# Altium PCB PCB1.PcbDoc
Units mm, origin at the board's own origin, x right, y up, seen from the top; angles counter-clockwise.
Board outline 64.6 x 83.5 mm, 2 copper layers (Top Layer, Bottom Layer); 84 components, 48 nets, 237 pads, 0 vias.
Unrouted connection lines stored in the file: 143.
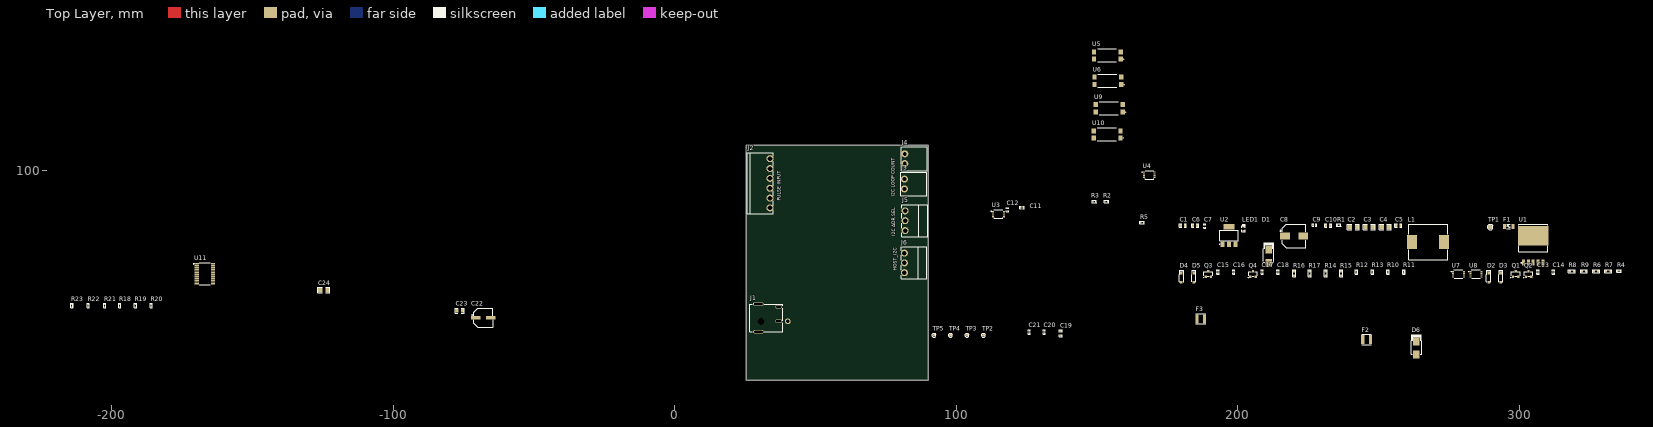
[diagram p0: Top Layer view]
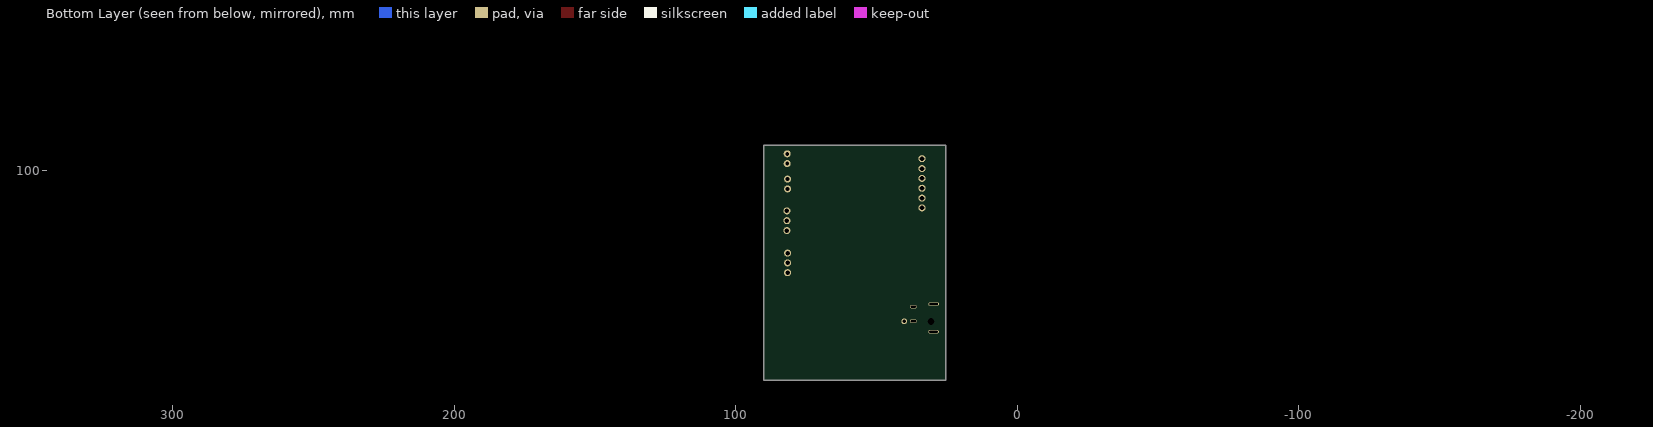
[diagram p1: Bottom Layer view, seen from below]

## Layer stack, top to bottom
Top Solder: solder mask 0.0102, Solder Resist, Dk 3.5
Top Layer: signal copper 0.0356
Dielectric 1: dielectric 0.32, FR-4, Dk 4.8
Bottom Layer: signal copper 0.0356
Bottom Solder: solder mask 0.0102, Solder Resist, Dk 3.5

## Board outline
25.4,25.4 25.4,108.9 90,108.9 90,25.4

## Design rules (kind name [scope] priority, off if disabled: settings)
Clearance [All] p1: gap=0.254 ignorepadtopadclearanceinfootprint=FALSE except(0: Arc-Hole Track-Hole SMDPad-Hole THPad-Hole Via-Hole Fill-Hole Poly-Hole Region-Hole Text-Hole)
PolygonConnect [All] p1: connectstyle=Relief reliefconductorwidth=0.254 reliefentries=4 polygonreliefangle="90 Angle" airgapwidth=0.254
RoutingVias [All] p1: holewidth=0.711 width=1.27 viastyle="Through Hole" minholewidth=0.711 minwidth=1.27 maxholewidth=0.711 maxwidth=1.27
SolderMaskExpansion [All] p1: expansion=0.102 istentingtop=FALSE
Width [All] p1: maxlimit=0.254 minlimit=0.254 preferedwidth=0.254
30 further rules are at their usual default settings.

## Classes and differential pairs
component class "Pulse counter_Sheet": C11 C12 C13 C14 C15 C16 C17 C18 D2 D3 D4 D5 Q1 Q2 Q3 Q4 R2 R3 R4 R5 R6 R7 R8 R9 R10 R11 R12 R13 R14 R15 R16 R17 TP2 TP3 TP4 TP5 U3 U4 U5 U6 U7 U8 U9 U10
component class Power_Sheet: C1 C2 C3 C4 C5 C6 C7 C8 C9 C10 D1 F1 L1 LED1 R1 TP1 U1 U2
component class "I2C Mux_Sheet": C19 C20 C21 R18 R19 R20 R21 R22 R23 U11
component class Connector_Sheet: C22 C23 C24 D6 F2 F3 J1 J2 J3 J4 J5 J6

## Components (designator, comment, footprint, x,y, rotation, side; value= is the part's Value field where it differs from the comment)
C1 "10uF" Cap-0603 180.467,80.391 r0 top
C2 "47uF" Cap-1206 241.046,79.883 r0 top
C3 "47uF" Cap-1206 246.634,79.883 r0 top
C4 "47uF" Cap-1206 252.349,79.883 r0 top
C5 "0.1uF" Cap-0603 257.048,80.391 r0 top value=100nF
C6 "10uF" Cap-0603 184.785,80.391 r0 top
C7 "100nF" cap-0402 188.214,80.137 r90 top
C8 "100uF" UUD-100uF-8mmDia 219.964,76.708 r0 top
C9 "100nF" cap-0402 227.203,80.518 r0 top
C10 "0.47uF" Cap-0603 232.029,80.391 r0 top
C11 "1uF" Cap-0402 123.317,86.741 r180 top
C12 "100nF" cap-0402 118.11,85.979 r270 top
C13 "1uF" Cap-0402 306.578,63.881 r90 top
C14 "100nF" cap-0402 312.166,63.881 r90 top
C15 "1uF" Cap-0402 192.913,63.881 r90 top
C16 "100nF" cap-0402 198.501,63.881 r90 top
C17 "1uF" Cap-0402 208.661,63.881 r90 top
C18 "100nF" cap-0402 214.249,63.881 r90 top
C19 "10uF" Cap-0603 137.16,42.037 r90 top
C20 "100nF" cap-0402 131.191,42.545 r90 top
C21 "1uF" Cap-0402 125.857,42.545 r90 top
C22 "220uF" 189RV0019 -68.072,47.625 r0 top
C23 "1uF" Cap-0805 -76.454,50.165 r0 top
C24 "47uF" Cap-1206 -124.714,57.404 r0 top
D1 "SS54B-HF" SMB_ 210.947,69.469 r90 top
D2 "AZ4024-01G" SOD-123 289.052,61.849 r90 top
D3 "AZ4024-01G" SOD-123 293.37,61.849 r90 top
D4 "AZ4024-01G" SOD-123 179.959,61.849 r90 top
D5 "AZ4024-01G" SOD-123 184.277,61.849 r90 top
D6 "SS510B" SMB_ 263.398,36.83 r90 top
F1 "1206L300SLTHYR" "Fuse 1206 (3216 Metric)" 296.164,80.01 r0 top
F2 "1210L075/24PR" FUSE-1210 245.745,39.878 r0 top
F3 "1210L075/24PR" FUSE-1210 186.817,47.244 r0 top
J1 "DC-044K-D025" DC-044K-D025 34.882,47.56 r0 top
J2 "JL15EDGRC-35006G01" JL15EDGRC-35006G01 33.782,95.377 r270 top
J3 "691322110002" 691322110002 81.534,95.123 r90 top
J4 "691322110002" 691322110002 81.661,104.112 r90 top
J5 "DB2ERC-3.5-3P-GN" DB2ERC-3.5-3P-GN 81.788,82.098 r90 top
J6 "DB2ERC-3.5-3P-GN" DB2ERC-3.5-3P-GN 81.534,67.112 r90 top
L1 "68uH" FCH1365-680M 267.589,74.549 r0 top
LED1 "RED" LED-0603 202.057,79.248 r90 top
Q1 "BC846B(1B)" SOT-23 298.704,63.119 r0 top
Q2 "BC846B(1B)" SOT-23 303.276,63.119 r0 top
Q3 "BC846B(1B)" SOT-23 189.484,63.119 r0 top
Q4 "BC846B(1B)" SOT-23 205.359,63.119 r0 top
R1 "499R" Res-0402 235.839,80.518 r0 top
R2 "1K" Res-0402 153.289,88.9 r0 top
R3 "1K" Res-0402 148.971,88.9 r0 top
R4 "1K" Res-0402 335.407,64.262 r0 top
R5 "1K" Res-0402 165.989,81.407 r0 top
R6 "1K" Res-0603 327.279,64.135 r0 top value=1kR
R7 "1K" Res-0603 331.597,64.135 r0 top value=1kR
R8 "3.3kΩ" Res-0603 318.643,64.135 r0 top
R9 "3.3kΩ" Res-0603 322.961,64.135 r0 top
R10 "1K" Res-0402 253.365,63.881 r90 top
R11 "1K" Res-0402 258.953,63.881 r90 top
R12 "1K" Res-0402 242.189,63.881 r90 top
R13 "1K" Res-0402 247.777,63.881 r90 top
R14 "1K" Res-0603 231.14,63.373 r90 top value=1kR
R15 "1K" Res-0603 236.728,63.373 r90 top value=1kR
R16 "3.3kΩ" Res-0603 219.964,63.373 r90 top
R17 "3.3kΩ" Res-0603 225.552,63.373 r90 top
R18 "4.7K" Res-0402 -197.231,51.943 r90 top
R19 "DNP" Res-0402 -191.643,51.943 r90 top
R20 "DNP" Res-0402 -186.055,51.943 r90 top
R21 "4.7K" Res-0402 -202.565,51.943 r90 top
R22 "4.7K" Res-0402 -208.407,51.943 r90 top
R23 "4.7K" Res-0402 -214.249,51.943 r90 top
TP1 "TEST POINT" Test-point 289.687,79.883 r0 top
TP2 "TEST POINT 0.5mm Dia" "Test-point - 0.5mm" 109.601,41.402 r90 top
TP3 "TEST POINT 0.5mm Dia" "Test-point - 0.5mm" 103.759,41.402 r90 top
TP4 "TEST POINT 0.5mm Dia" "Test-point - 0.5mm" 97.917,41.402 r90 top
TP5 "TEST POINT 0.5mm Dia" "Test-point - 0.5mm" 92.075,41.402 r90 top
U1 "LM2596SX-5.0/NOPB" DDPAK 304.927,72.009 r0 top
U2 "AMS1117-3.3" "SOT- 223" 196.85,76.835 r0 top
U3 "" 8-TMSOP 114.935,84.455 r0 top
U4 "" 8-TMSOP 168.534,98.369 r0 top
U5 "" SFH617A-2X009T 153.67,140.843 r180 top
U6 "" SFH617A-2X009T 153.797,131.826 r180 top
U7 "" 8-TMSOP 278.384,63.119 r0 top
U8 "" 8-TMSOP 284.607,63.119 r0 top
U9 "" SFH617A-2X009T 154.305,122.047 r180 top
U10 "" SFH617A-2X009T 153.543,112.776 r180 top
U11 "MAX7357EUG+" 24-TSSOP -167.005,63.246 r0 top

## Footprints (in the part's own frame and the unit in brackets; to place one, negate y for a bottom-side part, rotate by r counter-clockwise, add the part's x,y. Pads: shape width x height; smd on the part's side, far side on the other; paste and mask are expansions set on the pad)
8-TMSOP [mm]
  rect 0.73x0.4 smd: 1(-1.9,0.975) 2(-1.9,0.325) 3(-1.9,-0.325) 4(-1.9,-0.975)
  rect 0.7x0.4 smd: 5(1.9,-0.975) 6(1.9,-0.325) 7(1.9,0.325) 8(1.9,0.975)
  silkscreen extent -2.56,-1.5 1.5,1.5, body extent -2,-1.45 2,1.45, height 0.93
24-TSSOP [mm]
  rect 1.5x0.45 smd: 1(-2.9,3.575) 2(-2.9,2.925) 3(-2.9,2.275) 4(-2.9,1.625) 5(-2.9,0.975) 6(-2.9,0.325) 7(-2.9,-0.325) 8(-2.9,-0.975) 9(-2.9,-1.625) 10(-2.9,-2.275) 11(-2.9,-2.925) 12(-2.9,-3.575) 13(2.9,-3.575) 14(2.9,-2.925) 15(2.9,-2.275) 16(2.9,-1.625) 17(2.9,-0.975) 18(2.9,-0.325) 19(2.9,0.325) 20(2.9,0.975) 21(2.9,1.625) 22(2.9,2.275) 23(2.9,2.925) 24(2.9,3.575)
  silkscreen extent -3.94,-3.96 1.96,3.96, body extent -3.2,-3.9 3.2,3.9, height 1.2
189RV0019 [mm]
  rect 3.5x1.2 smd paste+0 mask+0.051: 1(-2.67,0) 2(2.67,0)
  silkscreen extent -4.07,-3.38 3.38,3.38, body extent -3.9,-3.3 3.9,3.3, height 7.75
691322110002 [mm]
  round 2.5 hole 1.4 paste+0 mask+0.051: 1(-1.75,0) 2(1.75,0)
  silkscreen extent -4.2,-8 4.2,1.27, body extent -4.2,-7.98 4.2,1.22, height 7.2
cap-0402 [mil]
  rect 18x25 smd mask+2.36: 1(-18.5,0) 2(18.5,0)
  silkscreen extent -31,-16 31,16, body extent -20,-10 20,10, height 19
Cap-0402 [mil]
  rect 18x25 smd mask+2.36: 1(-18.5,0) 2(18.5,0)
  silkscreen extent -31,-16 31,16, body extent -20,-10 20,10, height 19
Cap-0603 [mil]
  rect 30x35 smd mask+2.36: 1(-30,0) 2(30,0)
  silkscreen extent -49,-21 49,21, body extent -32,-16 31,16, height 34
Cap-0805 [mil] "SMD 0805"
  rect 40x60 smd mask+2.76: 1(-40,0) 2(40,0)
  silkscreen extent -64,-34 64,34, body extent -39,-25 39,25, height 30
Cap-1206 [mil] "SMD 1206"
  rect 60x70 smd: 1(-50,0) 2(50,0)
  silkscreen extent -84,-39 84,39, body extent -63,-31 63,32, height 39
DB2ERC-3.5-3P-GN [mm]
  round 2.5 hole 1.6 paste+0 mask+0.051: 1(-3.5,0) 2(0,0) 3(3.5,0)
  silkscreen extent -5.7,-8 5.7,1.2, body extent -5.65,-7.93 5.65,1.27, height 7.2
DC-044K-D025 [mm]
  oval 3.8x1.2 hole 0.6 slot 3 at 0 deg copper offset 0,0 paste-2539.97 mask+0.051: 1(-5.225,4.925)
  oval 2.5x1.2 hole 0.6 slot 2 at 0 deg copper offset 0,0.001 paste-2539.97 mask+0.051: 2(1.975,3.996)
  oval 2.5x1.2 hole 0.6 slot 2 at 0 deg copper offset 0,-0.001 paste-2539.97 mask+0.051: 3(1.975,-1.206)
  round 2 hole 1.3 paste-2539.97 mask+0.051: 4(5.225,-1.205)
  oval 3.8x1.2 hole 0.6 slot 3 at 0 deg paste-2539.97 mask+0.051: 6(-5.225,-4.925)
  round 0 hole 2.5 unplated paste-2539.97 mask+0.051: MH(-4.275,-1.205)
  silkscreen extent -8.27,-4.93 3.35,4.85, body extent -8.3,-5.03 5.7,5.07, height 7.3
DDPAK [mm]
  rect 1.07x2.16 smd mask+0.05: 1(-3.4,-4.797) 2(-1.7,-4.797) 3(0,-4.797) 4(1.7,-4.797) 5(3.4,-4.797)
  rect 10.8x6.99 smd mask+0.05: 6(0,4.798)
  silkscreen extent -5.13,-4.98 5.13,8.89, body extent -5.08,-5.52 5.08,8.83, height 4.75
FCH1365-680M [mm]
  rect 3.5x5 smd paste+0 mask+0.051: 1(-5.7,0) 2(5.7,0)
  silkscreen extent -6.9,-6.3 6.9,6.3, body extent -7.2,-6.4 7.2,6.4, height 6.51
"Fuse 1206 (3216 Metric)" [mm] "0.126\" L x 0.062\" W x 0.026\" H (3.20mm x 1.58mm x 0.65mm)"
  rect 1.06x1.82 smd: 1(-1.528,0) 2(1.528,0)
  silkscreen extent -0.68,-0.85 0.68,0.85, body extent -1.6,-0.79 1.6,0.79, height 0.85
FUSE-1210 [mm]
  rect 1.15x3.2 smd: 1(-1.34,0) 2(1.34,0)
  silkscreen extent -1.72,-1.8 1.72,1.8, body extent -1.61,-1.29 1.61,1.29, height 1.8
JL15EDGRC-35006G01 [mm]
  round 2.5 hole 1.6 paste+0 mask+0.051: 1(-8.75,0) 2(-5.25,0) 3(-1.75,0) 4(1.75,0) 5(5.25,0) 6(8.75,0)
  silkscreen extent -10.9,-8.1 10.9,1.2, body extent -10.9,-8.09 10.9,1.21, height 7.3
LED-0603 [mm]
  rect 0.5x1 smd: 1(-0.75,0) 2(0.75,0)
  silkscreen extent -1.12,-0.66 1.75,0.66, body extent -0.82,-0.37 0.82,0.36, height 0.68
Res-0402 [mil]
  rect 18x25 smd mask+2.17: 1(-18.5,0) 2(18.5,0)
  silkscreen extent -32,-17 32,16, body extent -23,-11 23,11, height 16
Res-0603 [mil]
  rect 30x35 smd: 1(-30,0) 2(30,0)
  silkscreen extent -48,-21 48,21, body extent -31,-17 31,17, height 18
SFH617A-2X009T [mm]
  rect 1.52x1.78 smd mask+0.07: 1(-4.765,1.27) 2(-4.765,-1.27) 3(4.765,-1.27) 4(4.765,1.27)
  silkscreen extent -5.81,-2.36 3.53,2.36, body extent -5.08,-2.29 5.08,2.29, height 3.75
SMB_ [mm]
  rect 2.8x2.4 smd: 1(-2.3,0) 2(2.3,0)
  silkscreen extent -2.21,-1.91 4.83,1.91, body extent -2.7,-1.8 2.7,1.8, height 2.3
SOD-123 [mm]
  rect 0.95x0.9 smd: 1(-1.575,0) 2(1.575,0)
  silkscreen extent -1.37,-0.8 2.82,0.8, body extent -1.82,-0.78 1.83,0.78, height 1.5
SOT-23 [mm] "TRANS NPN 40V 0.6A SOT23"
  rect 0.82x0.92 smd: 1(-0.95,-1) 2(0.95,-1) 3(0,1)
  silkscreen extent -1.68,-1.3 1.55,0.81, body extent -1.5,-1.25 1.5,1.25, height 1.05
"SOT- 223" [mm]
  rect 1.5x2 smd: 1(-2.3,-3.05) 2(0,-3.05) 3(2.3,-3.05)
  rect 3.8x2 smd: 4(0,3.05)
  silkscreen extent -3.35,-3.2 3.3,1.8, body extent -3.25,-3.5 3.25,3.5, height 1.61
Test-point [mil]
  oct 60x60 smd: 1(0,0)
  silkscreen extent -37,-37 37,37
"Test-point - 0.5mm" [mm]
  oct 1x1 smd: 1(0,0)
  silkscreen extent -0.68,-0.68 0.68,0.68
UUD-100uF-8mmDia [mm] "0.327\" L x 0.327\" W (8.30mm x 8.30mm)"
  rect 3.5x2.5 smd: 1(-3.25,0) 2(3.25,0)
  silkscreen extent -5.05,-4.19 4.17,4.19, body extent -4.44,-4.15 4.45,4.15, height 10.06

## Part data
C1 C6 C19: library part C1608X5R1E106M080AC, "CAP CER 10UF 25V X5R 0603", Case Code (Imperial)=0603, Case Code (Metric)=1608, Dielectric=X5R, Dielectric Material=Ceramic, LCSC Part Number=C2168289, Manufacturer=TDK, Max Operating Temperature=85°C, Min Operating Temperature=-55°C, Package Quantity=1, Supplier Part Number 1=445-9015-1-ND, Tolerance=20%, Voltage Rating=25V, Capacitance=10uF, Case/Package=0603, Composition=Ceramic, Depth=0.8mm, Height=0.8mm, Item Type=Capacitor, Lead Free="Lead Free", Length=1.6mm, Manufacturer Part Number=C1608X5R1E106M080AC, Mount="Surface Mount", Packaging="Tape and Reel", Pricing 1="1=0.96, 10=0.704, 100=0.483, 500=0.38238, 1000=0.322 (USD)", REACH SVHC="No SVHC", Stock 1=61681, Supplier 1=Digi-Key, Termination=SMD/SMT, Thickness=0.039inch, Voltage Rating (DC)=25V, Weight=7.1E-05oz, Width=0.8mm
C2 C3 C4 C24: library part GRM31CR61E476ME44L, "CAP CER 47UF 25V X5R 1206", Dielectric=X5R, LCSC Part Number=C403725, Manufacturer=Murata, Supplier Part Number 1=490-16268-2-ND, Tolerance=20%, Voltage Rating (DC)=25V, Capacitance=47uF, Category="Ceramic Capacitors", ComponentLink1Description=https://search.murata.co.jp/Ceramy/image/img/A01X/partnumbering_e_01.pdf?src-supplier=Digi-Key, ComponentLink1URL=https://search.murata.co.jp/Ceramy/image/img/A01X/partnumbering_e_01.pdf?src-supplier=Digi-Key, Item Type=Capacitor, Length=3.2mm, Manufacturer Part Number=GRM31CR61E476ME44L, RoHS=Yes, Supplier 1=Digi-Key, Thickness=1.6mm, Width=1.6mm
C5: library part CL10B104KB8WPNC, "CAP CER 0.1UF 50V X7R 0603", Case Code (Imperial)=0603, Case Code (Metric)=1608, LCSC Part Number=C307348, Max Operating Temperature=125°C, Min Operating Temperature=-55°C, Ratings=AEC-Q200, Supplier Part Number=2575919, Tolerance=10%, Voltage Rating=50V, Case/Package=0603, Category="Ceramic Capacitors", ComponentLink1Description=LCSC, ComponentLink2Description=http://www.farnell.com/datasheets/2710560.pdf?src-supplier=Farnell, ComponentLink2URL=http://www.farnell.com/datasheets/2710560.pdf?src-supplier=Farnell, ComponentLink3Description=http://www.samsungsem.com/kr/support/product-search/mlcc/CL10B104KB8WPNC.jsp?src-supplier=Digi-Key, ComponentLink3URL=http://www.samsungsem.com/kr/support/product-search/mlcc/CL10B104KB8WPNC.jsp?src-supplier=Digi-Key, ComponentLink4Description=http://www.farnell.com/datasheets/2710560.pdf?src-supplier=Element14, ComponentLink4URL=http://www.farnell.com/datasheets/2710560.pdf?src-supplier=Element14, ComponentLink5Description=https://datasheet.octopart.com/CL10B104KB8WPNC-Samsung-Electro-Mechanics-datasheet-120093645.pdf?src-supplier=Future+Electronics, ComponentLink5URL=https://datasheet.octopart.com/CL10B104KB8WPNC-Samsung-Electro-Mechanics-datasheet-120093645.pdf?src-supplier=Future+Electronics, ComponentLink6Description=http://www.farnell.com/datasheets/2710560.pdf?src-supplier=Newark, ComponentLink6URL=http://www.farnell.com/datasheets/2710560.pdf?src-supplier=Newark, ComponentLink7Description=http://www.samsungsem.com/servlet/FileDownload?type=spec&file=CL10B104KB8WPNC.pdf&src-supplier=Avnet, ComponentLink7URL=http://www.samsungsem.com/servlet/FileDownload?type=spec&file=CL10B104KB8WPNC.pdf&src-supplier=Avnet, ComponentLink8Description=https://datasheet.octopart.com/CL10B104KB8WPNC-Samsung-datasheet-8326407.pdf?src-supplier=TME, ComponentLink8URL=https://datasheet.octopart.com/CL10B104KB8WPNC-Samsung-datasheet-8326407.pdf?src-supplier=TME, Height=900um, Item Type=Capacitor, Lead Free=5697LeadFree, Material=4241ConductorMaterial, Mounting Technology="Surface Mount", Packaging="Cut Tape", Pricing="100=0.021, 500=0.019, 1000=0.015, 2000=0.01 (GBP)", RoHS=Yes, RoHS Compliant=Yes, Series=CL, Stock=400, Supplier=Rs, Voltage Rating (DC)=50V
C7 C9 C12 C14 C16 C18 C20: library part C1005X7R1H104KT000F, "CAP CER 0.1UF 50V X7R 0402", Dielectric=X7R, LCSC Part Number=C361198, Manufacturer=TDK, Tolerance=10%, Voltage=25V, Category="Ceramic Capacitors", ComponentLink1Description=LCSC, ComponentLink1URL=https://www.lcsc.com/product-detail/Multilayer-Ceramic-Capacitors-MLCC-SMD-SMT_TDK-C1005X7R1H104KT000F_C361198.html, Item Type=Capacitor, Manufacturer Part Number=C1005X7R1H104KT000F, RoHS=No, Supplier 1=Avnet, Supplier Part Number 1=C1005X7R1H104KT000F
C8: library part UUD1H101MNL1GS, "CAP ALUM 100UF 20% 50V SMD", Case/Package=Radial, Dielectric Material=Aluminium, LCSC Part Number=C116241, Leakage Current=3uA, Manufacturer=Nichicon, Max Operating Temperature=105°C, Min Operating Temperature=-55°C, Package Quantity=500, Ripple Current=300mA, Supplier Part Number 1=493-2306-6-ND, Tolerance=20%, Voltage=50V, Capacitance=100uF, Category="Aluminum Electrolytic Capacitors", ComponentLink1Description=https://datasheet.ciiva.com/6002/66055-6002224.pdf?src-supplier=Farnell, ComponentLink1URL=https://datasheet.ciiva.com/6002/66055-6002224.pdf?src-supplier=Farnell, ComponentLink2Description=https://datasheet.ciiva.com/11781/0900766b80fa39e7-11781901.pdf?src-supplier=RSComponents, ComponentLink2URL=https://datasheet.ciiva.com/11781/0900766b80fa39e7-11781901.pdf?src-supplier=RSComponents, ComponentLink3Description=https://datasheet.ciiva.com/97/e-ud-97939.pdf?src-supplier=Digi-Key, ComponentLink3URL=https://datasheet.ciiva.com/97/e-ud-97939.pdf?src-supplier=Digi-Key, ComponentLink4Description=https://datasheet.ciiva.com/97/e-ud-97940.pdf?src-supplier=Digi-Key, ComponentLink4URL=https://datasheet.ciiva.com/97/e-ud-97940.pdf?src-supplier=Digi-Key, ComponentLink5Description=https://datasheet.ciiva.com/97/e-ud-97941.pdf?src-supplier=Digi-Key, ComponentLink5URL=https://datasheet.ciiva.com/97/e-ud-97941.pdf?src-supplier=Digi-Key, ComponentLink6Description=https://datasheet.ciiva.com/28458/e-ud-28458117.pdf?src-supplier=Element14, ComponentLink6URL=https://datasheet.ciiva.com/28458/e-ud-28458117.pdf?src-supplier=Element14, ComponentLink7Description=https://datasheet.ciiva.com/28458/1910936-28458133.pdf?src-supplier=Element14, ComponentLink7URL=https://datasheet.ciiva.com/28458/1910936-28458133.pdf?src-supplier=Element14, ComponentLink8Description=https://datasheet.ciiva.com/5362/e-ud-5362134.pdf?src-supplier=Mouser, ComponentLink8URL=https://datasheet.ciiva.com/5362/e-ud-5362134.pdf?src-supplier=Mouser, ComponentLink9Description=https://datasheet.ciiva.com/7781/66055-7781450.pdf?src-supplier=Element14, ComponentLink9URL=https://datasheet.ciiva.com/7781/66055-7781450.pdf?src-supplier=Element14, ComponentLink10Description=https://datasheet.ciiva.com/17354/e-ud-17354671.pdf?src-supplier=Avnet+Europe, ComponentLink10URL=https://datasheet.ciiva.com/17354/e-ud-17354671.pdf?src-supplier=Avnet+Europe, Construction=Cylindrical, Diameter=8mm, Dissipation Factor=0.14%, Height=10mm, Height - Seated (Max)=0.394inch, Impedance=340mR, Item Type=Capacitor, Lead Diameter=1.1mm, Lead Free="Lead Free", Lead Pitch=3.1mm, Length=10mm, Life (Hours)=5000Hour, Manufacturer Part Number=UUD1H101MNL1GS, Number of Pins=2, Packaging="Tape and Reel", Pricing 1="1=0.62000, 10=0.44000, 50=0.33300, 100=0.29000 (USD)", Radiation Hardening=No, REACH SVHC="No SVHC", Ripple Current (AC)=300mA, RoHS=Yes, RoHS Compliant=Yes, Series=UD, Supplier 1=Digi-Key, Termination=SMD/SMT, Voltage Rating=50V, Voltage Rating (DC)=50V
C10: library part CL10A474KB8NNNC, "CAP CER 0.47UF 50V X5R 0603", Capacitance=470nF, Case Code (Imperial)=0603, Case Code (Metric)=1608, Dielectric=X5R, LCSC Part Number=C170149, Manufacturer=Samsung, Max Operating Temperature=85°C, Min Operating Temperature=-55°C, Package Quantity=1, Tolerance=10%, Voltage Rating=50V, Case/Package=0603, Category="Ceramic Capacitors", ComponentLink1Description=https://datasheet.ciiva.com/25798/cl10a474kb8nnnc-25798516.pdf?src-supplier=Digi-Key, ComponentLink1URL=https://datasheet.ciiva.com/25798/cl10a474kb8nnnc-25798516.pdf?src-supplier=Digi-Key, ComponentLink2Description=https://datasheet.ciiva.com/15195/getdatasheetpartid-353290-15195713.pdf?src-supplier=Verical, ComponentLink2URL=https://datasheet.ciiva.com/15195/getdatasheetpartid-353290-15195713.pdf?src-supplier=Verical, Construction=Flat, Depth=0.8mm, Height=0.8mm, Lead Free="Lead Free", Length=1.6mm, Manufacturer Part Number=CL10A474KB8NNNC, Mount="Surface Mount", Packaging="Tape and Reel", Pricing 1="200000=0.04290, 300000=0.04250, 400000=0.04210, 500000=0.04170, 1000000=0.04120, 2000000=0.04080 (USD)", Radiation Hardening=No, RoHS=Yes, RoHS Compliant=Yes, Series=CL, Stock 1=196000, Supplier 1="Arrow Electronics", Supplier Part Number 1=CL10A474KB8NNNC, Thickness=0.035inch, Voltage Rating (DC)=50V, Width=0.031inch
C11 C13 C15 C17 C21: library part C1005X5R1V105K050BC, "CAP CER 1UF 35V X5R 0402", Case Code (Imperial)=0402, Case Code (Metric)=1005, Dielectric=X5R, Dielectric Material=Ceramic, Manufacturer=TDK, Max Operating Temperature=85°C, Min Operating Temperature=-55°C, Supplier Part Number=445-9073-1-ND, Tolerance=10%, Voltage Rating=35V, Case/Package=0402, ComponentLink1Description=https://datasheet.ciiva.com/26834/getdatasheetpartid-750449-26834298.pdf?src-supplier=Verical, ComponentLink1URL=https://datasheet.ciiva.com/26834/getdatasheetpartid-750449-26834298.pdf?src-supplier=Verical, ComponentLink2Description=https://datasheet.ciiva.com/28451/1796654-28451087.pdf?src-supplier=Element14, ComponentLink2URL=https://datasheet.ciiva.com/28451/1796654-28451087.pdf?src-supplier=Element14, ComponentLink3Description=https://datasheet.ciiva.com/22719/1796654-22719533.pdf?src-supplier=Element14, ComponentLink3URL=https://datasheet.ciiva.com/22719/1796654-22719533.pdf?src-supplier=Element14, Depth=0.5mm, Item Type=Capacitors, Lead Free="Lead Free", Length=1mm, Manufacturer Part Number=C1005X5R1V105K050BC, Material=4241ConductorMaterial, Mounting Technology="Surface Mount", Packaging="Tape and Reel", Pricing="1=0.15, 10=0.087, 50=0.061, 100=0.0528, 500=0.03898, 1000=0.03468, 2500=0.03011, 5000=0.02735 (USD)", Radiation Hardening=No, Reach SVHC Compliant=No, RoHS=Yes, RoHS Compliant=Yes, Series=C, Stock=682645, Supplier=Digikey
C22: library part 189RV0019, "220uF 35V 600mA@100KHz 160mΩ@100KHz ±20% SMD,D6.3xL7.7mm Aluminum Electrolytic Capacitors - SMD ROHS", LCSC Part Number=C7471881, Manufacturer=KNSCHA, Package=SMD,D6.3xL7.7mm, ComponentLink1Description=LCSC, ComponentLink1URL=https://www.lcsc.com/product-detail/Aluminum-Electrolytic-Capacitors-SMD_KNSCHA-189RV0019_C7471881.html, Item Type=Capacitors, Manufacturer Part Number=189RV0019
C23: library part GCM21BC72A105KE36L, "CAP CER 1UF 100V X7S 0805", Case Code (Imperial)=0805, Case Code (Metric)=2012, LCSC Part Number=C2842838, Manufacturer=Murata, Max Operating Temperature=125°C, Min Operating Temperature=-55°C, Ratings=AEC-Q200, Supplier Part Number 1=490-14436-1-ND, Tolerance=10%, Voltage Rating=100V, Capacitance=1uF, Case/Package=0805, Category="Ceramic Capacitors", ComponentLink1Description=http://search.murata.co.jp/Ceramy/image/img/A01X/partnumbering_e_02.pdf?src-supplier=Digi-Key, ComponentLink1URL=http://search.murata.co.jp/Ceramy/image/img/A01X/partnumbering_e_02.pdf?src-supplier=Digi-Key, Manufacturer Part Number=GCM21BC72A105KE36L, Mount="Surface Mount", Packaging="Cut Tape", Pricing 1="1=0.48000, 10=0.34100, 50=0.25800, 100=0.22480, 500=0.16650, 1000=0.14152 (USD)", RoHS=Yes, RoHS Compliant=Yes, Stock 1=179138, Supplier 1=Digi-Key
D1: "DIODE SCHOTTKY 5A 40V SMB", LCSC Part Number=C3759253, Manufacturer=Comchip, Supplier Part Number 1=750-SS54B-HF, Manufacturer Part Number=SS54B-HF, Pricing 1="1=0.56000, 10=0.32900, 50=0.32900, 100=0.17100, 1000=0.11900, 10000=0.09000 (USD)", RoHS=No, Stock 1=2862, Supplier 1=Mouser
D2 D3 D4 D5: "26.7V 24V SOD-123 ESD and Surge Protection (TVS/ESD) ROHS", LCSC Part Number=C5571859, Manufacturer=AMAZING, Package=SOD-123, ComponentLink1Description=LCSC, ComponentLink1URL=https://www.lcsc.com/product-detail/ESD-and-Surge-Protection-TVS-ESD_AMAZING-AZ4024-01G_C5571859.html, Item Type=(TVS/ESD), Manufacturer Part Number=AZ4024-01G
D6: "SCHOTTKY DIODE SMB 100V 5A", LCSC Part Number=C3011128, Manufacturer=MDD, Package=SMB, ComponentLink1Description=LCSC, ComponentLink1URL=https://www.lcsc.com/product-detail/Schottky-Barrier-Diodes-SBD_JUXING-SS510B_C3011128.html, Item Type=Diode, Manufacturer Part Number=SS510B
F1: "PTC RESET FUSE 6V 3A 1206", Case Code (Imperial)=1206, Case Code (Metric)=3216, Hold Current=3A, LCSC Part Number=C207041, Manufacturer=Littelfuse, Max Current Rating=50A, Max Operating Temperature=85°C, Max Voltage Rating (DC)=6V, Min Operating Temperature=-40°C, Package Quantity=4000, Power Dissipation=800mW, Resistance=20mR, Trip Current=6A, Approvals=UL,TUV, Case/Package=1206, Category="PTC Resettable Fuses", ComponentLink1Description=https://datasheet.ciiva.com/7438/littelfuse-lorho-ptc-7438567.pdf?src-supplier=Digi-Key, ComponentLink1URL=https://datasheet.ciiva.com/7438/littelfuse-lorho-ptc-7438567.pdf?src-supplier=Digi-Key, ComponentLink2Description=https://datasheet.ciiva.com/7438/littelfuse-lorho-ptc-7438569.pdf?src-supplier=Digi-Key, ComponentLink2URL=https://datasheet.ciiva.com/7438/littelfuse-lorho-ptc-7438569.pdf?src-supplier=Digi-Key, ComponentLink3Description=https://datasheet.ciiva.com/7438/littelfuse-lorho-ptc-7438565.pdf?src-supplier=Digi-Key, ComponentLink3URL=https://datasheet.ciiva.com/7438/littelfuse-lorho-ptc-7438565.pdf?src-supplier=Digi-Key, Item Type=Fuse, Lead Free="Lead Free", Manufacturer Part Number=1206L300SLTHYR, Operating Supply Voltage=6V, Packaging="Tape and Reel", Pricing 1="4000=0.60290 (USD)", RoHS=Yes, RoHS Compliant=Yes, Series="POLY-FUSE®, LoRho™", Stock 1=4000, Supplier 1="Arrow Electronics", Supplier Part Number 1=1206L300SLTHYR, Termination=SMD/SMT, Time to Trip=4s, Voltage Rating (DC)=6V
F2 F3: "24V 750mA 100A 1.5A 1210 Resettable Fuses ROHS", Current Rating=100A, LCSC Part Number=C207045, Manufacturer=Littlefuse, Supplier Part Number=F4146CT-ND, Voltage Rating=24V, Category="PTC Resettable Fuses", ComponentLink1Description=https://datasheet.ciiva.com/8005/littelfuse-ptc-1210l-8005372.pdf?src-supplier=Element14, ComponentLink1URL=https://datasheet.ciiva.com/8005/littelfuse-ptc-1210l-8005372.pdf?src-supplier=Element14, ComponentLink2Description=https://datasheet.ciiva.com/326/littelfuse-ptc-1210l-326060.pdf?src-supplier=Digikey, ComponentLink2URL=https://datasheet.ciiva.com/326/littelfuse-ptc-1210l-326060.pdf?src-supplier=Digikey, ComponentLink3Description=https://datasheet.ciiva.com/326/littelfuse-ptc-1210l-326061.pdf?src-supplier=Digikey, ComponentLink3URL=https://datasheet.ciiva.com/326/littelfuse-ptc-1210l-326061.pdf?src-supplier=Digikey, ComponentLink4Description=https://datasheet.ciiva.com/326/littelfuse-ptc-1210l-326062.pdf?src-supplier=Digikey, ComponentLink4URL=https://datasheet.ciiva.com/326/littelfuse-ptc-1210l-326062.pdf?src-supplier=Digikey, Height=1.8mm, Item Type=Fuse, Lead Free=5697LeadFree, Manufacturer Part Number=1210L075/24PR, Pricing="1=0.98, 5=0.81, 10=0.747, 50=0.6196, 100=0.5716, 250=0.51376, 500=0.47378, 1000=0.43676 (USD)", RoHS=Yes, Stock=2300, Supplier=Digikey
J1: "Bend insert DC Power Receptacle -30℃~+85℃ 2.5mm 6mm 7A 24V Plugin DC Power Connectors ROHS", LCSC Part Number=C963204, Manufacturer=G-Switch, Package=Plugin, ComponentLink1Description=LCSC, ComponentLink1URL=https://www.lcsc.com/product-detail/DC-Power-Connectors_G-Switch-DC-044K-D025_C963204.html, Item Type="DC Power Connectors", Manufacturer Part Number=DC-044K-D025
J2: "300V 8A 6 Bend -40℃~+105℃ 1 3.5mm 1x6P Green Receptacle-Close Push-Pull,P=3.5mm Pluggable System Terminal Block ROHS", LCSC Part Number=C409119, Manufacturer=JILN, Package=Push-Pull,P=3.5mm, ComponentLink1Description=LCSC, ComponentLink1URL=https://www.lcsc.com/product-detail/Pluggable-System-Terminal-Block_JILN-JL15EDGRC-35006G01_C409119.html, Item Type="Terminal Block", Manufacturer Part Number=JL15EDGRC-35006G01
J3 J4: "TERM BLOCK HDR 2POS 90DEG 3.5MM", Color=Green, Current=10A, Flammability Rating="UL94 V-0", Manufacturer="Wurth Electronics", Supplier Part Number=732-2769-ND, Voltage=300V, ComponentLink1Description=https://datasheet.ciiva.com/8043/1442234-8043560.pdf?src-supplier=Element14, ComponentLink1URL=https://datasheet.ciiva.com/8043/1442234-8043560.pdf?src-supplier=Element14, ComponentLink2Description=https://datasheet.ciiva.com/795/6913221100xx-795775.pdf?src-supplier=Digikey, ComponentLink2URL=https://datasheet.ciiva.com/795/6913221100xx-795775.pdf?src-supplier=Digikey, Contact Material=Brass, Height=9.2mm, Housing Material=Nylon, Item Type="Terminal Blocks", Lead Free="Lead Free", Length=10.5mm, Manufacturer Part Number=691322110002, Mounting Technology="Through Hole", Number of Contacts=2, Number of Levels=1, Number of Positions=2, Number of Positions Per Level=2, Number of Rows=1, Pitch=3.5mm, Pricing="1=0.4, 10=0.355, 50=0.306, 100=0.2745, 500=0.2574, 1000=0.2421 (USD)", Reach SVHC Compliant=Unknown, RoHS=Yes, RoHS Compliant=Yes, Series="WR-TBL Series 3221", Stock=3605, Supplier=Digikey, Termination=Solder, Voltage Rating=300V, Width=8.1mm
J5 J6: "250V 10A 3 Bend -40℃~+105℃ 1 3.5mm 1x3P Green Board Edge/Receptacle-Close Push-Pull,P=3.5mm Pluggable System Terminal Block ROHS", LCSC Part Number=C430551, Manufacturer=DORABO, Package=Push-Pull,P=5.08mm, ComponentLink1Description=LCSC, ComponentLink1URL=https://www.lcsc.com/product-detail/Pluggable-System-span-style-background-color-ff0-Terminal-span-span-style-background-color-ff0-Block-span_DORABO-DB2ERC-3-5-3P-GN_C430551.html, Item Type="Terminal Block", Manufacturer Part Number=DB2ERC-3.5-3P-GN
L1: library part FCH1365-680M, "4.5A 68uH Molding Choke ±20% 5.5A SMD,13.7x12.8mm Power Inductors ROHS", LCSC Part Number=C20415558, Manufacturer=FANGCHENG, Package=SMD,13.7x12.8mm, ComponentLink1Description=LCSC, ComponentLink1URL=https://www.lcsc.com/product-detail/Power-Inductors_FANGCHENG-FCH1365-680M_C20415558.html, Item Type=Inductor, Manufacturer Part Number=FCH1365-680M
LED1: library part NCD0603R3, "RED LED 0603 Light Emitting Diodes", LCSC Part Number=C3151730, Manufacturer="Foshan NationStar Optoelectronics", Package=0603, ComponentLink1Description=LCSC, ComponentLink1URL=https://www.lcsc.com/product-detail/Light-Emitting-Diodes-LED_Foshan-NationStar-Optoelectronics-NCD0603R3_C3151730.html, Item Type=LED, Manufacturer Part Number=NCD0603R3
Q1 Q2 Q3 Q4: "65V 300mW 200@2mA,5V 100mA NPN SOT-23 Bipolar Transistors - BJT ROHS", LCSC Part Number=C118727, Manufacturer=ST(Semtech), Package=SOT-23, ComponentLink1Description=LCSC, ComponentLink1URL=https://www.lcsc.com/product-detail/Transistors-NPN-PNP_ST-Semtech-BC846B-1B_C118727.html, Item Type=Transistor, Manufacturer Part Number=BC846B(1B)
R1: library part RC0402FR-07499RL, "RES 499 OHM 1% 1/16W 0402", Case Code (Imperial)=0402, Case Code (Metric)=1005, LCSC Part Number=C137970, Manufacturer=Yageo, Max Operating Temperature=155°C, Max Power Dissipation=63mW, Min Operating Temperature=-55°C, Package Quantity=1, Power Rating=62.5mW, Resistance Tolerance=1%, Resistor Type="Thick Film", Supplier Part Number 1=603-RC0402FR-07499RL, Temperature Coefficient=100ppm/°C, Voltage Rating=50V, Case/Package=0402, Category="Chip SMD Resistors", ComponentLink1Description=https://datasheet.ciiva.com/2453/pyu-r-int-thick-7-2453539.pdf?src-supplier=Digi-Key, ComponentLink1URL=https://datasheet.ciiva.com/2453/pyu-r-int-thick-7-2453539.pdf?src-supplier=Digi-Key, ComponentLink2Description=https://datasheet.ciiva.com/2453/pyu-r-int-thick-7-2453540.pdf?src-supplier=Digi-Key, ComponentLink2URL=https://datasheet.ciiva.com/2453/pyu-r-int-thick-7-2453540.pdf?src-supplier=Digi-Key, ComponentLink3Description=https://datasheet.ciiva.com/2453/pyu-r-int-thick-7-2453538.pdf?src-supplier=Digi-Key, ComponentLink3URL=https://datasheet.ciiva.com/2453/pyu-r-int-thick-7-2453538.pdf?src-supplier=Digi-Key, Construction=Rectangular, Depth=0.5mm, Features="Moisture Resistant", Height=0.016inch, Lead Free="Lead Free", Length=1mm, Manufacturer Part Number=RC0402FR-07499RL, Military Standard=Not, Number of Terminations=2, Packaging="Tape and Reel", Pricing 1="1=0.10000, 10=0.01200, 50=0.01200, 100=0.00500, 1000=0.00300, 10000=0.00100 (USD)", REACH SVHC="No SVHC", Resistance=499R, RoHS=Yes, RoHS Compliant=Yes, Series=RC, Size Code=0402, Stock 1=936879, Supplier 1=Mouser, Termination=SMD/SMT, Tolerance=1%, Voltage Rating (DC)=50V, Width=0.02inch
R2 R3 R4 R5 R10 R11 R12 R13: library part RC0402JR-071KL, "RES 1K OHM 5% 1/16W 0402", Case Code (Imperial)=0402, Case Code (Metric)=1005, LCSC Part Number=C105637, Manufacturer=Yageo, Max Operating Temperature=155°C, Max Power Dissipation=63mW, Min Operating Temperature=-55°C, Package Quantity=1, Power Rating=62.5mW, Resistance=1kR, Resistance Tolerance=5%, Resistor Type="Thick Film", Supplier Part Number 1=311-1.0KJRCT-ND, Temperature Coefficient=100ppm/°C, Voltage Rating=50V, Case/Package=0402, Category="Chip SMD Resistors", ComponentLink1Description=https://datasheet.ciiva.com/7983/1018594-7983558.pdf?src-supplier=Element14, ComponentLink1URL=https://datasheet.ciiva.com/7983/1018594-7983558.pdf?src-supplier=Element14, ComponentLink2Description=https://datasheet.ciiva.com/2452/pyu-r-int-thick-7-2452756.pdf?src-supplier=Digi-Key, ComponentLink2URL=https://datasheet.ciiva.com/2452/pyu-r-int-thick-7-2452756.pdf?src-supplier=Digi-Key, ComponentLink3Description=https://datasheet.ciiva.com/2452/pyu-r-int-thick-7-2452757.pdf?src-supplier=Digi-Key, ComponentLink3URL=https://datasheet.ciiva.com/2452/pyu-r-int-thick-7-2452757.pdf?src-supplier=Digi-Key, ComponentLink4Description=https://datasheet.ciiva.com/2452/pyu-r-int-thick-7-2452755.pdf?src-supplier=Digi-Key, ComponentLink4URL=https://datasheet.ciiva.com/2452/pyu-r-int-thick-7-2452755.pdf?src-supplier=Digi-Key, ComponentLink5Description=https://datasheet.ciiva.com/7850/1018594-7850170.pdf?src-supplier=Element14, ComponentLink5URL=https://datasheet.ciiva.com/7850/1018594-7850170.pdf?src-supplier=Element14, ComponentLink6Description=https://datasheet.ciiva.com/7850/1018594-7850171.pdf?src-supplier=Element14, ComponentLink6URL=https://datasheet.ciiva.com/7850/1018594-7850171.pdf?src-supplier=Element14, ComponentLink7Description=https://datasheet.ciiva.com/17081/pyu-rc0402-51-rohs-l-6-r-17081438.pdf?src-supplier=Future+Electronics, ComponentLink7URL=https://datasheet.ciiva.com/17081/pyu-rc0402-51-rohs-l-6-r-17081438.pdf?src-supplier=Future+Electronics, Construction=Rectangular, Depth=0.5mm, Features="Moisture Resistant", Height=0.016inch, Item Type=Resistor, Lead Free="Lead Free", Length=0.039inch, Manufacturer Part Number=RC0402JR-071KL, Military Standard=Not, Number of Terminations=2, Packaging="Tape and Reel", Pricing 1="1=0.10000, 10=0.01300, 100=0.00540, 1000=0.00244, 2500=0.00212, 5000=0.00175 (USD)", REACH SVHC="No SVHC", RoHS=Yes, RoHS Compliant=Yes, Series=RC, Size Code=0402, Stock 1=452315, Supplier 1=Digi-Key, Termination=SMD/SMT, Tolerance=5%, Width=0.02inch
R6 R7 R14 R15: library part CRCW06031K00FKEA, "RES SMD 1K OHM 1% 1/10W 0603", Case Code (Imperial)=0603, Case Code (Metric)=1608, LCSC Part Number=C844920, Manufacturer="Vishay Dale", Max Operating Temperature=155°C, Max Power Dissipation=100mW, Min Operating Temperature=-55°C, Package Quantity=5000, Ratings=AEC-Q200, Resistance Tolerance=1%, Resistor Type="Thick Film", Supplier Part Number=71-CRCW0603-1.0K-E3, Temperature Coefficient=100ppm/°C, Voltage Rating=75V, Case/Package=0603, Category="Chip SMD Resistors", ComponentLink1Description=https://datasheet.ciiva.com/11808/0900766b80d98afc-11808625.pdf?src-supplier=Rs, ComponentLink1URL=https://datasheet.ciiva.com/11808/0900766b80d98afc-11808625.pdf?src-supplier=Rs, ComponentLink2Description=https://datasheet.ciiva.com/11808/0900766b80d98afc-11808625.pdf?src-supplier=Rs, ComponentLink2URL=https://datasheet.ciiva.com/11808/0900766b80d98afc-11808625.pdf?src-supplier=Rs, ComponentLink3Description=https://datasheet.ciiva.com/46441/1720486-46441623.pdf?src-supplier=Element14, ComponentLink3URL=https://datasheet.ciiva.com/46441/1720486-46441623.pdf?src-supplier=Element14, ComponentLink4Description=https://datasheet.ciiva.com/46441/1720486-46441622.pdf?src-supplier=Element14, ComponentLink4URL=https://datasheet.ciiva.com/46441/1720486-46441622.pdf?src-supplier=Element14, ComponentLink5Description=https://datasheet.ciiva.com/26316/fld-crcw-e3-data-en-26316551.pdf?src-supplier=Distrelec, ComponentLink5URL=https://datasheet.ciiva.com/26316/fld-crcw-e3-data-en-26316551.pdf?src-supplier=Distrelec, ComponentLink6Description=https://datasheet.ciiva.com/2465/dcrcwe3-2465536.pdf?src-supplier=Digi-Key, ComponentLink6URL=https://datasheet.ciiva.com/2465/dcrcwe3-2465536.pdf?src-supplier=Digi-Key, ComponentLink7Description=https://datasheet.ciiva.com/2465/dcrcwe3-2465534.pdf?src-supplier=Digi-Key, ComponentLink7URL=https://datasheet.ciiva.com/2465/dcrcwe3-2465534.pdf?src-supplier=Digi-Key, ComponentLink8Description=https://datasheet.ciiva.com/16199/dcrcwe3-16199053.pdf?src-supplier=Future+Electronics, ComponentLink8URL=https://datasheet.ciiva.com/16199/dcrcwe3-16199053.pdf?src-supplier=Future+Electronics, ComponentLink9Description=https://datasheet.ciiva.com/46385/1697337-46385497.pdf?src-supplier=Element14, ComponentLink9URL=https://datasheet.ciiva.com/46385/1697337-46385497.pdf?src-supplier=Element14, ComponentLink10Description=https://datasheet.ciiva.com/2465/dcrcwe3-2465535.pdf?src-supplier=Digi-Key, ComponentLink10URL=https://datasheet.ciiva.com/2465/dcrcwe3-2465535.pdf?src-supplier=Digi-Key, ComponentLink11Description=https://datasheet.ciiva.com/8336/dcrcwe3-8336822.pdf?src-supplier=Avnet, ComponentLink11URL=https://datasheet.ciiva.com/8336/dcrcwe3-8336822.pdf?src-supplier=Avnet, ComponentLink12Description=https://datasheet.ciiva.com/3257/dcrcwe3-3257132.pdf?src-supplier=Avnet, ComponentLink12URL=https://datasheet.ciiva.com/3257/dcrcwe3-3257132.pdf?src-supplier=Avnet, ComponentLink13Description=https://datasheet.ciiva.com/2465/dcrcwe3-2465535.pdf?src-supplier=Digikey, ComponentLink13URL=https://datasheet.ciiva.com/2465/dcrcwe3-2465535.pdf?src-supplier=Digikey, ComponentLink14Description=https://datasheet.ciiva.com/2465/dcrcwe3-2465536.pdf?src-supplier=Digikey, ComponentLink14URL=https://datasheet.ciiva.com/2465/dcrcwe3-2465536.pdf?src-supplier=Digikey, ComponentLink15Description=https://datasheet.ciiva.com/2465/dcrcwe3-2465534.pdf?src-supplier=Digikey, ComponentLink15URL=https://datasheet.ciiva.com/2465/dcrcwe3-2465534.pdf?src-supplier=Digikey, Construction=Rectangular, Contact Plating=Tin, Depth=0.85mm, Features="Automotive AEC-Q200", Height=0.45mm, Item Type=Resistor, Lead Free=5697LeadFree, Length=1.55mm, Manufacturer Part Number=CRCW06031K00FKEA, Military Standard=Not, Number of Terminations=2, Packaging="Tape and Reel", Pins=2, Power Rating=100mW, Pricing="1=0.1, 10=0.017, 50=0.017, 100=0.01, 1000=0.008, 10000=0.004 (USD)", Radiation Hardening=No, Reach SVHC Compliant=Unknown, RoHS=Yes, RoHS Compliant=Yes, Series=CRCW, Stock=1295653, Supplier=Mouser, Technology="THICK FILM", Termination=SMD/SMT, Tolerance=1%, Voltage Rating (DC)=75V, Weight=7.1E-05oz, Width=0.85mm
R8 R9 R16 R17: library part SR0603JR-7T3K3L, "250mW Thick Film Resistors 75V ±100ppm/℃ ±5% 3.3kΩ 0603 Chip Resistor - Surface Mount ROHS", LCSC Part Number=C873727, Manufacturer=Yageo, ComponentLink1Description=LCSC, ComponentLink1URL=https://www.lcsc.com/product-detail/Chip-Resistor-Surface-Mount_YAGEO-SR0603JR-7T3K3L_C873727.html, Item Type=Resistors, Manufacturer Part Number=SR0603JR-7T3K3L, Pricing="5000=0.0081, 15000=0.0078, 25000=0.0077, 100000=0.0074, 150000=0.0073 (USD)", RoHS=Yes, Stock=10000, Supplier="Future Electronics"
R18 R19 R20 R21 R22 R23: library part RC0402FR-074K7L, "RES 4.7K OHM 1% 1/16W 0402", Case Code (Imperial)=0402, Case Code (Metric)=1005, LCSC Part Number=C105871, Manufacturer=Yageo, Max Operating Temperature=155°C, Max Power Dissipation=63mW, Min Operating Temperature=-55°C, Power Rating=62.5mW, Resistance=4.7kR, Resistance Tolerance=1%, Resistor Type="Thick Film", Temperature Coefficient=100ppm/°C, Voltage Rating=50V, Case/Package=0402, Category="Chip SMD Resistors", ComponentLink1Description=https://datasheet.ciiva.com/22661/1686128-22661342.pdf?src-supplier=Element14, ComponentLink1URL=https://datasheet.ciiva.com/22661/1686128-22661342.pdf?src-supplier=Element14, ComponentLink2Description=https://datasheet.ciiva.com/7850/1018594-7850022.pdf?src-supplier=Element14, ComponentLink2URL=https://datasheet.ciiva.com/7850/1018594-7850022.pdf?src-supplier=Element14, ComponentLink3Description=https://datasheet.ciiva.com/7850/1018594-7850023.pdf?src-supplier=Element14, ComponentLink3URL=https://datasheet.ciiva.com/7850/1018594-7850023.pdf?src-supplier=Element14, ComponentLink4Description=https://datasheet.ciiva.com/15215/getdatasheetpartid-328119-15215035.pdf?src-supplier=Verical, ComponentLink4URL=https://datasheet.ciiva.com/15215/getdatasheetpartid-328119-15215035.pdf?src-supplier=Verical, Construction=Rectangular, Depth=0.5mm, Features="Moisture Resistant", Height=0.32mm, Height - Seated (Max)=0.016inch, Item Type=Resistor, Lead Free="Lead Free", Length=1mm, Manufacturer Part Number=RC0402FR-074K7L, Military Standard=Not, Number of Pins=2, Number of Terminations=2, Packaging="Tape and Reel", Pricing 1="10000=0.00085 (USD)", Reach SVHC Compliant=Yes, RoHS=Yes, RoHS Compliant=Yes, Series=RC, Size Code=0402, Stock 1=2420000, Supplier 1=Avnet, Supplier Part Number 1=RC0402FR-074K7L, Termination=SMD/SMT, Tolerance=1%, Voltage Rating (DC)=50V, Width=0.5mm
TP1 TP2 TP3 TP4 TP5: "Test Point ON"
  TP1: Item Type="TEST POINT"
  TP2 TP3 TP4 TP5: Item Type="Test Point", Manufacturer Part Number="TEST POINT 0.5mm Dia"
U1: "IC REG BUCK 5V 3A TO263", Case/Package=TO-263, LCSC Part Number=C10002, Manufacturer="TI National Semiconductor", Max Operating Temperature=125°C, Max Supply Voltage=40V, Min Input Voltage=4.5V, Min Operating Temperature=-40°C, Min Output Voltage=5V, Output Current=3A, Package Quantity=500, Quiescent Current=5mA, Switching Frequency=150kHz, Efficiency=80%, Item Type=IC, Lead Free="Contains Lead", Manufacturer Part Number=LM2596SX-5.0/NOPB, Mounting Technology="Surface Mount", Nominal Output Voltage=5V, Number of Channels=1NUMBER, Number of Outputs=1, Output Configuration=Positive, Output Type=Fixed, Output Voltage=5V, Packaging="Tape and Reel", Pins=5, Pricing="1=5.76, 10=4.08, 50=4.08, 100=3.71, 1000=3.28, 10000=3.28 (USD)", Reach SVHC Compliant=No, RoHS=Yes, Series="SIMPLE SWITCHER®", Stock=2657, Supplier=Mouser, Synchronous Rectifier=No, Thickness=4.58mm
U2: "SOT-223 Linear Voltage Regulators (LDO) ROHS", LCSC Part Number=C2992570, Manufacturer="GUOXIN JIAPIN SEMICONDUCTOR", Package=SOT-223, ComponentLink1Description=LCSC, ComponentLink1URL=https://www.lcsc.com/product-detail/Linear-Voltage-Regulators-LDO_GUOXIN-JIAPIN-SEMICONDUCTOR-AMS1117-3-3_C2992570.html, Item Type=IC, Manufacturer Part Number=AMS1117-3.3
U3 U4 U7 U8: library part S-35770E01I-K8T2U, "IC OSC 2-WIRE TIMER 1MHZ 8TMSOP", LCSC Part Number=C2666930, Manufacturer=ABLIC, Item Type=IC, Manufacturer Part Number=S-35770E01I-K8T2U, Pricing="1=7.55, 10=5.036, 25=4.3812, 100=3.6411, 250=3.27772, 500=3.13 (USD)", RoHS=Yes, Stock=2912, Supplier=Digikey
U5 U6 U9 U10: library part SFH617A-2X009T, "OPTOISOLATOR 5.3KV TRANS 4SMD", LCSC Part Number=C5334420, Manufacturer=Vishay, ComponentLink1Description=https://datasheet.ciiva.com/18616/options-18616575.pdf?src-supplier=Digikey, ComponentLink1URL=https://datasheet.ciiva.com/18616/options-18616575.pdf?src-supplier=Digikey, Item Type=IC, Manufacturer Part Number=SFH617A-2X009T, Pricing="1=0.3234, 10=0.3216, 25=0.3197, 100=0.3179, 250=0.3161, 500=0.3142 (USD)", RoHS=Yes, Stock=871, Supplier="Arrow Electronics"
U11: "IC MULTIPLEXER 8X1 24TSSOP", Case/Package=TSSOP, LCSC Part Number=C1557096, Manufacturer=Maxim, Max Operating Temperature=85°C, Max Power Dissipation=1.11W, Min Operating Temperature=-40°C, Operating Supply Current=65uA, Operating Supply Voltage=5.5V, Package Quantity=62, Category="Interface ICs", ComponentLink1Description=https://datasheet.ciiva.com/1676/max7356-max7358-1676412.pdf?src-supplier=Digikey, ComponentLink1URL=https://datasheet.ciiva.com/1676/max7356-max7358-1676412.pdf?src-supplier=Digikey, ComponentLink2Description=https://datasheet.ciiva.com/14295/max7356-max7358-14295500.pdf?src-supplier=Avnet, ComponentLink2URL=https://datasheet.ciiva.com/14295/max7356-max7358-14295500.pdf?src-supplier=Avnet, Item Type=IC, Logic Function=Multiplexer, Manufacturer Part Number=MAX7357EUG+, Mounting Technology="Surface Mount", Number of Channels=8, Packaging=Rail/Tube, Pins=24, Pricing="1=7.78, 10=6.09, 50=4.85, 100=4.47, 1000=4.13, 10000=4.12 (USD)", Propagation Delay=0.3ns, RoHS=Yes, RoHS Compliant=Yes, Series=-, Supplier=Mouser, Supply Type=Single

## Nets (pads, with @x,y where several pads share a name; then routed paths per layer and width w, separated by ;. In a path a pad name is that pad's centre, name@x,y a point inside that pad or via, vN(x,y) a via of type N, cw(c..) or ccw(c..) an arc to the next point about the centre after c; other vN are vias at no path point)
3V3: C6.2 C7.2 C11.2 C12.2 C13.2 C14.2 C15.2 C16.2 C17.2 C18.2 C19.1 C20.2 C21.1 R2.2 R3.2 R4.2 R5.2 R10.2 R11.2 R12.2 R13.2 R19.2 R20.2 R22.1 U2.2 U2.4 U3.8 U4.8 U5.4 U6.4 U7.8 U8.8 U9.4 U10.4 U11.24
+5V: C1.2 F1.2 F3.2 R1.1 TP1.1 U2.3 U5.1 U6.1 U9.1 U10.1
COUNT_IN1: R6.1 U3.3 U5.3
COUNT_IN2: R14.1 U7.3 U9.3
COUNT_IN3: R7.1 U4.3 U6.3
COUNT_IN4: R15.1 U8.3 U10.3
DC_IN: C8.1 C9.2 C10.2 C22.1 C23.2 F2.2 U1.1
GND: C1.1 C2.1 C3.1 C4.1 C5.1 C6.1 C7.1 C8.2 C9.1 C10.1 C11.1 C12.1 C13.1 C14.1 C15.1 C16.1 C17.1 C18.1 C19.2 C20.1 C21.2 C22.2 C23.1 C24.1 D1.1 D2.1 D3.1 D4.1 D5.1 J1.1 J1.2 J1.3 J1.6 J2.6 J6.1 LED1.2 Q1.2 Q2.2 Q3.2 Q4.2 R6.2 R7.2 R14.2 R15.2 R18.1 R21.1 R23.2 U1.3 U1.5 U1.6 U2.1 U3.4 U4.4 U7.4 U8.4 U11.12
HOST_I2C_SCL: J6.2 R20.1 U11.22
HOST_I2C_SDA: J6.3 R19.1 U11.23
I2C_ADR_1: J5.1 R18.2 U11.1
I2C_ADR_2: J5.2 R21.2 U11.2
I2C_ADR_3: J5.3 R23.1 U11.21
LOOP1: J3.1 U3.5
LOOP2: J3.2 U7.5
LOOP3: J4.1 U4.5
LOOP4: J4.2 U8.5
NetC2_2: C2.2 C3.2 C4.2 C5.2 F1.1 L1.2 U1.4
NetC24_2: C24.2 F3.1 J2.5
NetD1_2: D1.2 L1.1 U1.2
NetD6_1: D6.1 J1.4
NetD6_2: D6.2 F2.1
NetLED1_1: LED1.1 R1.2
NetQ1_1: Q1.1 R8.2
NetQ1_3: Q1.3 U5.2
NetQ2_1: Q2.1 R9.2
NetQ2_3: Q2.3 U6.2
NetQ3_1: Q3.1 R16.2
NetQ3_3: Q3.3 U9.2
NetQ4_1: Q4.1 R17.2
NetQ4_3: Q4.3 U10.2
NetR22_2: R22.2 U11.3
Pulse_1: D2.2 J2.1 R8.1
Pulse_2: D4.2 J2.2 R16.1
Pulse_3: D3.2 J2.3 R9.1
Pulse_4: D5.2 J2.4 R17.1
RST#1: TP3.1 U3.1
RST#2: TP5.1 U7.1
RST#3: TP2.1 U4.1
RST#4: TP4.1 U8.1
SCL1: R2.1 U3.7 U11.5
SCL2: R10.1 U7.7 U11.7
SCL3: R3.1 U4.7 U11.9
SCL4: R11.1 U8.7 U11.11
SDA1: R4.1 U3.6 U11.4
SDA2: R12.1 U7.6 U11.6
SDA3: R5.1 U4.6 U11.8
SDA4: R13.1 U8.6 U11.10
pads on no net: J1.MH U3.2 U4.2 U7.2 U8.2 U11.13 U11.14 U11.15 U11.16 U11.17 U11.18 U11.19 U11.20

## Silkscreen, mask and mechanical layers (free items; w line width, h text height)
Top Overlay:
  text "I2C LOOP COUNT" at 78.647,90.678 h2.02 r90
  text "PULSE INPUT" at 38.117,89.236 h2.02 r90
  text "I2C ADR SEL" at 78.884,76.6 h2.02 r90
  text "HOST_I2C" at 79.265,64.271 h2.02 r90
Board Outline:
  the board outline again, w0.127